# Altium PCB 24V-70A-Power-Board-v2.0.PcbDoc (part 1 of 9)
Units mm, origin at the board's own origin, x right, y up, seen from the top; angles counter-clockwise.
Board outline 350 x 215 mm, 2 copper layers (Top Layer, Bottom Layer), stack 1.64 mm thick; 337 components, 182 nets, 856 pads, 561 vias.
Unrouted connection lines stored in the file: 58.
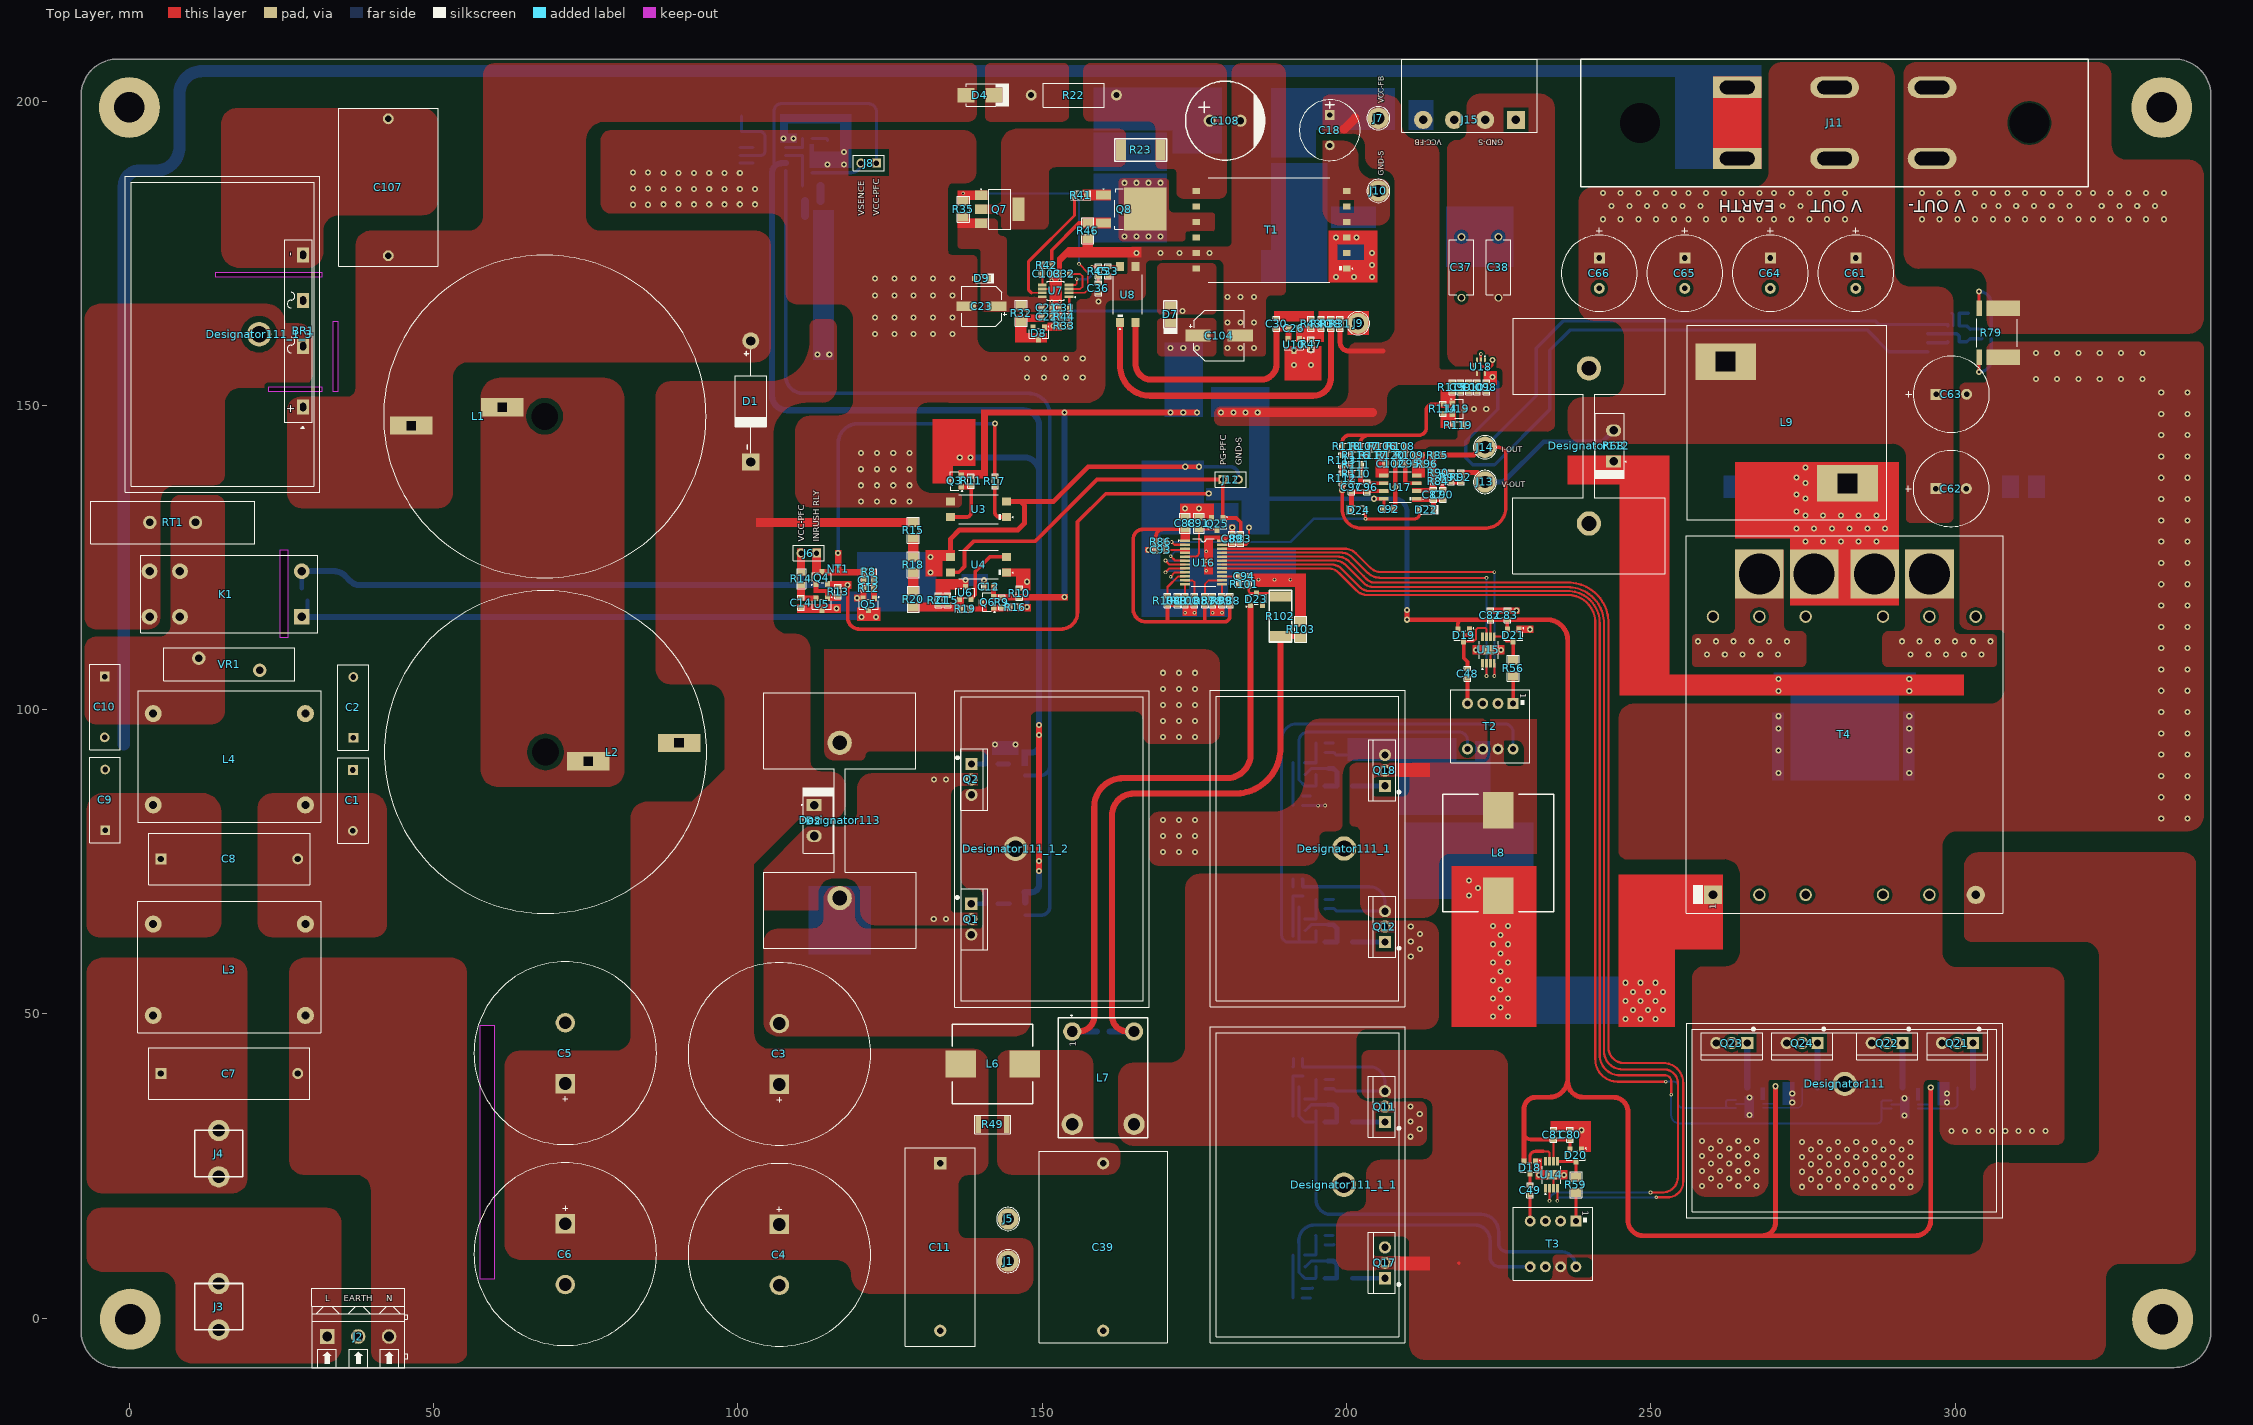
[diagram p0: Top Layer view]
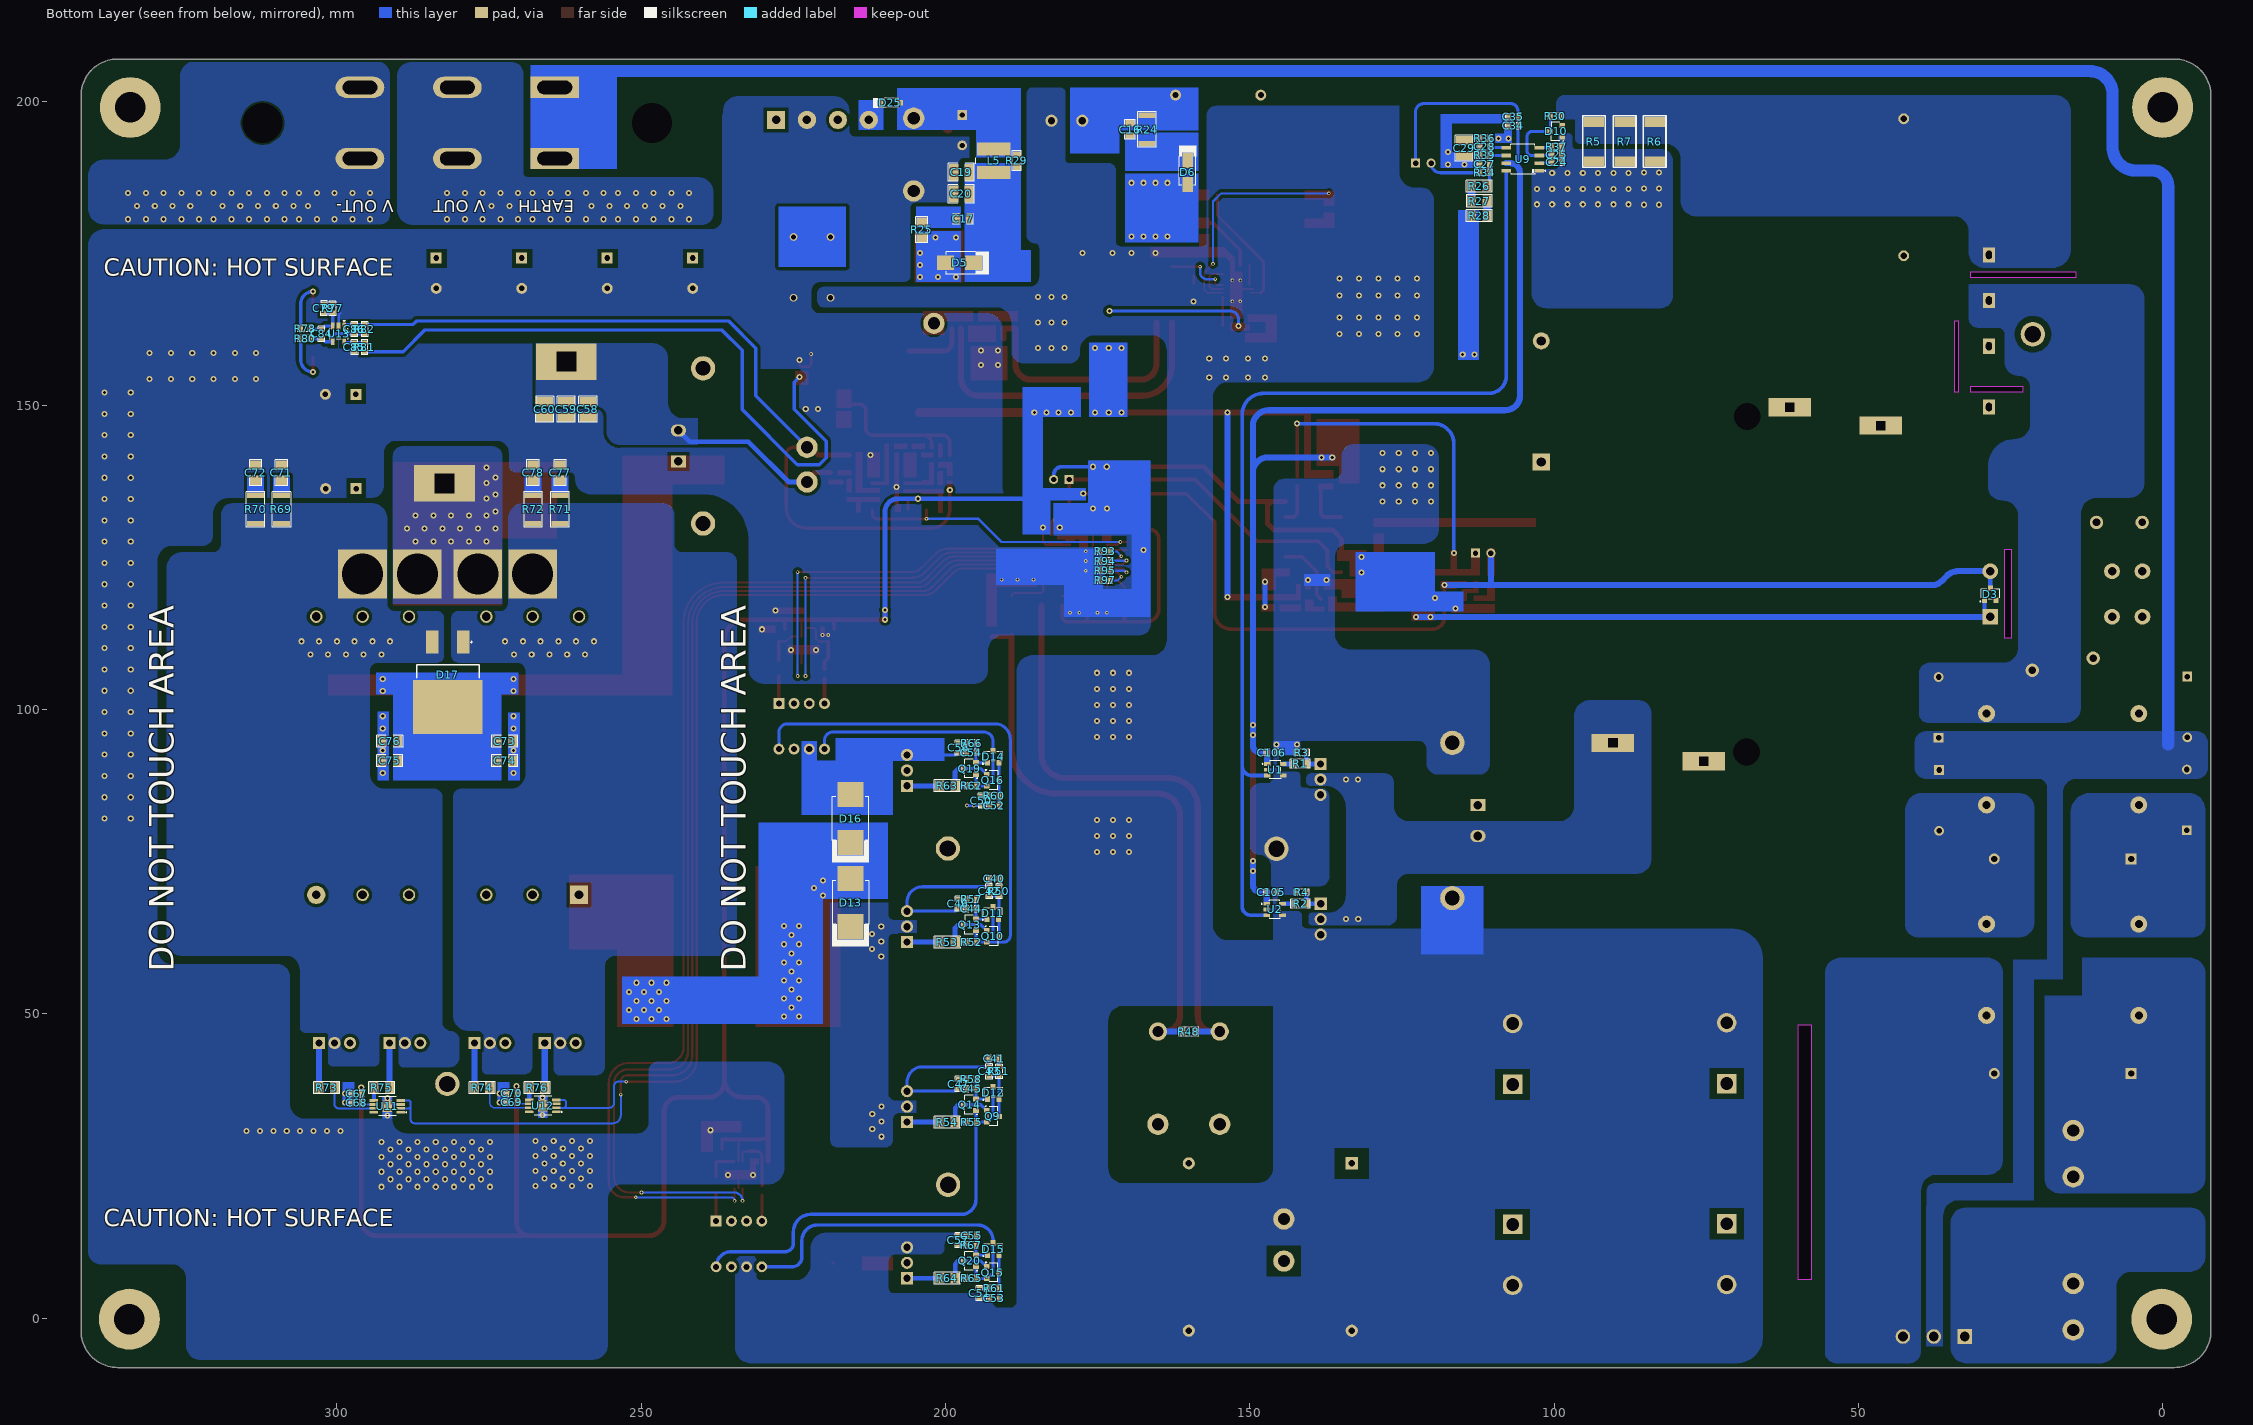
[diagram p1: Bottom Layer view, seen from below]

## Layer stack, top to bottom
Top Solder: solder mask 0.0102, Solder Resist, Dk 3.5
Top Layer: signal copper 0.07
Dielectric 1: core 1.5, FR-4, Dk 4.6
Bottom Layer: signal copper 0.07
Bottom Solder: solder mask 0.0102, Solder Resist, Dk 3.5

## Board outline
-7.942,-2.091 -7.942,200.909 cw(c-1.942,200.909) -1.942,206.909 336.058,206.909 cw(c336.058,200.909) 342.058,200.909 342.058,-2.091 cw(c336.058,-2.091) 336.058,-8.091 -1.942,-8.091 cw(c-1.942,-2.091)
cut-out: 34.282,152.281 33.482,152.281 33.482,163.853 34.282,163.853
cut-out: 24.765,111.785 24.765,126.263 26.035,126.263 26.035,111.785
cut-out: 57.658,6.452 57.658,48.113 59.99,48.113 59.99,6.452
cut-out: 22.936,152.281 22.936,153.081 31.648,153.081 31.648,152.281
cut-out: 14.199,171.094 14.199,171.894 31.648,171.894 31.648,171.094

## Design rules (kind name [scope] priority, off if disabled: settings)
BoardOutlineClearance [All] p1: gap=0 ignorepadtopadclearanceinfootprint=FALSE except(0.508: Poly-OutlineEdge)
Clearance [All] p1: gap=0.254 ignorepadtopadclearanceinfootprint=FALSE except(0.178: SMDPad-SMDPad; 0.508: Arc-Poly Track-Poly SMDPad-Poly THPad-Poly Via-Poly Fill-Poly Poly-Poly; 0.762: Poly-Region)
ComponentClearance [All] p1: gap=0 collisioncheckmode=3 verticalgap=0 showdistances=FALSE
Height [All] p1: minheight=0 maxheight=100 prefheight=12.7
HoleSize [All] p1: absolutevalues=TRUE maxlimit=25.4 minlimit=0.025 maxpercent=80.000 minpercent=20.000
MinimumSolderMaskSliver [All] p1: minsoldermaskwidth=0
PolygonConnect [All] p1: connectstyle=Direct reliefconductorwidth=0.254 reliefentries=4 polygonreliefangle="90 Angle" airgapwidth=0.254
RoutingVias [All] p1: holewidth=0.5 width=1 viastyle="Through Hole" minholewidth=0.3 minwidth=0.6 maxholewidth=0.5 maxwidth=1
SilkToSolderMaskClearance [IsPad] p1: minsilkscreentomaskgap=0 clearancetoexposedcopper=TRUE
SolderMaskExpansion Via [isvia] p1: expansion=0.102 istentingtop=TRUE
SupplyNets "Schematic Supply Nets_5" [InNet('GND-S')] p1: voltage=0.000
SupplyNets "Schematic Supply Nets_4" [InNet('GND')] p2: voltage=0.000
SupplyNets "Schematic Supply Nets_2" [InNet('AC_N')] p3: voltage=0.000
SupplyNets "Schematic Supply Nets_1" [InNet('EARTH')] p4: voltage=0.000
SupplyNets "Schematic Supply Nets" [InNet('AC_L')] p5: voltage=0.000
Width [All] p1: maxlimit=2.54 minlimit=0.127 preferedwidth=0.254 minimp=50.000000 maximp=50.000000 favimp=50.000000
25 further rules are at their usual default settings.

## Classes and differential pairs
component class U_Power_Sheet: C37 C38 C39 C40 C41 C42 C43 C44 C45 C46 C47 C48 C49 C50 C51 C52 C53 C54 C55 C56 C57 C58 C59 C60 C61 C62 C63 C64 C65 C66 C67 C68 C69 C70 C73 C74 C75 C76 C77 C78 C79 C80 C81 C82 C83 C84 C85 C86 D11 D12 D13 D14 D15 D16 D17 D18 D19 D20 D21 J11 L6 L7 L8 L9 Q9 Q10 Q11 Q12 Q13 Q14 Q15 Q16 Q17 Q18 Q19 Q20 Q21 Q22 Q23 Q24 R48 R49 R50 R51 R52 R53 R54 R55 R56 R57 R58 R59 R60 R61 R62 R63 R64 R65 R66 R67 R68 R71 R72 R73 R74 R75 R76 R77 R78 R79 R80 R81 R82 T2 T3 T4 U11 U12 U13 U14 U15
component class U_Control_Sheet: C87 C88 C89 C90 C91 C92 C93 C94 C95 C96 C97 C98 C99 C100 C101 C102 D22 D23 D24 D25 J12 J13 J14 J15 Q25 R83 R84 R85 R86 R87 R88 R89 R90 R91 R92 R93 R94 R95 R96 R97 R98 R99 R100 R101 R102 R103 R104 R105 R106 R107 R108 R109 R110 R111 R112 R113 R114 R115 R116 R117 R118 R119 R120 U16 U17 U18 U19
component class U_PFC_Sheet: BR1 C1 C2 C3 C4 C5 C6 C7 C8 C9 C10 C11 C12 C13 C14 C15 C16 C17 C18 C19 C20 C21 C22 C23 C24 C25 C26 C27 C28 C29 C30 C31 C32 C33 C34 C35 C36 C103 C104 C105 C106 C107 C108 D1 D2 D3 D4 D5 D6 D7 D8 D9 D10 J1 J2 J3 J4 J5 J6 J7 J8 J9 J10 K1 L1 L2 L3 L4 L5 NT1 Q1 Q2 Q3 Q4 Q5 Q6 Q7 Q8 R1 R2 R3 R4 R5 R6 R7 R8 R9 R10 R11 R12 R13 R14 R15 R16 R17 R18 R19 R20 R21 R22 R23 R24 R25 R26 R27 R28 R29 R30 R31 R32 R33 R34 R35 R36 R37 R38 R39 R40 R41 R42 R43 R44 R45 R46 R47 RT1 T1 U1 U2 U3 U4 U5 U6 U7 U8 U9 U10 VR1

## Components (designator, comment, footprint, x,y, rotation, side; value= is the part's Value field where it differs from the comment)
BR1 "GSIB2560-E3/45" GSIB-5S 28.538,162.235 r90 top
C1 "4.7nF" C771U472MYWDBA7317 36.739,85.096 r270 top
C2 "4.7nF" C771U472MYWDBA7317 36.816,100.374 r90 top
C3 "330uF" 381LR331M450K052 106.807,43.434 r90 top
C4 "330uF" 381LR331M450K052 106.807,10.414 r270 top
C5 "330uF" 381LR331M450K052 71.628,43.561 r90 top
C6 "330uF" 381LR331M450K052 71.628,10.541 r270 top
C7 "0.47uF" B32933A3474M000 16.412,40.219 r0 top value=470nF
C8 "0.47uF" B32933A3474M000 16.412,75.478 r0 top value=470nF
C9 "4.7nF" C771U472MYWDBA7317 -3.983,85.172 r90 top
C10 "4.7nF" C771U472MYWDBA7317 -4.06,100.45 r270 top
C11 "1uF" R75PR4100AA30K 133.245,11.708 r270 top value=470nF
C12 "1uF" Cap-0603 141.255,120.211 r0 top
C13 "0.1uF" Cap-0603 121.505,121.298 r0 top value=100nF
C14 "4.7uF" Cap-0603 110.373,117.566 r90 top
C15 "2700pF" Cap-0603 134.473,118.017 r270 top value=2.7nF
C16 "1nF" Cap-0805 169.672,195.342 r90 bottom
C17 "1nF" Cap-0805 197.104,180.642 r0 bottom
C18 "1000uF" EEU-FM1C102B 197.256,197.731 r270 top value=1mF
C19 "10uF" Cap-1210 197.383,188.305 r180 bottom
C20 "10uF" Cap-1210 197.383,184.749 r180 bottom
C21 "0.1uF" Cap-0603 150.786,166.048 r180 top value=100nF
C22 "1uF" Cap-0603 150.787,164.615 r180 top
C23 "22uF" EEEFK1H220P 140.046,166.289 r180 top
C24 "2700pF" Cap-0603 99.549,189.941 r0 bottom value=2.7nF
C25 "560pF" Cap-0603 99.549,191.211 r0 bottom
C26 "560pF" Cap-0603 191.364,162.658 r0 top
C27 "820pF" Cap-0603 111.404,189.644 r180 bottom
C28 "0.47uF" Cap-0603 111.379,192.485 r180 bottom
C29 "3.3uF" Cap-1210 114.751,192.278 r90 bottom
C30 "0.1uF" Cap-0603 188.519,163.42 r270 top value=100nF
C31 "68pF" Cap-0603 153.661,166.048 r0 top
C32 "0.22uF" Cap-0603 153.661,171.603 r0 top
C33 "220pF" Cap-0603 160.807,172.041 r90 top
C34 "1uF" Cap-0603 106.716,195.936 r180 bottom
C35 "0.1uF" Cap-0603 106.716,197.434 r180 bottom value=100nF
C36 "22nF" Cap-0603 159.233,169.267 r90 top
C37 "2.2nF" DE1E3RA222MN4AP01F 218.897,167.691 r90 top
C38 "2.2nF" DE1E3RA222MN4AP01F 224.968,177.691 r270 top
C39 "10uF" B32774X5106K000 160.02,11.708 r90 top
C40 "0.1uF" Cap-0603 191.973,72.212 r0 bottom value=100nF
C41 "0.1uF" Cap-0603 192.024,42.672 r0 bottom value=100nF
C42 "22nF" Cap-0603 192.817,70.145 r90 bottom
C43 "22nF" Cap-0603 192.817,40.562 r90 bottom
C44 "22nF" Cap-0603 195.745,67.288 r0 bottom
C45 "22nF" Cap-0603 195.744,37.705 r0 bottom
C46 "0.1uF" Cap-0603 197.904,68.088 r270 bottom value=100nF
C47 "0.1uF" Cap-0603 197.865,38.489 r270 bottom value=100nF
C48 "1uF" Cap-0603 219.892,105.918 r270 top
C49 "1uF" Cap-0603 230.189,21.031 r270 top
C50 "0.1uF" Cap-0603 194.107,85.014 r270 bottom value=100nF
C51 "0.1uF" Cap-0603 194.409,4.125 r270 bottom value=100nF
C52 "22nF" Cap-0603 191.98,84.245 r0 bottom
C53 "22nF" Cap-0603 191.98,3.325 r0 bottom
C54 "22nF" Cap-0603 195.745,92.957 r0 bottom
C55 "22nF" Cap-0603 195.719,13.598 r0 bottom
C56 "0.1uF" Cap-0603 197.831,93.754 r270 bottom value=100nF
C57 "0.1uF" Cap-0603 197.904,12.836 r90 bottom value=100nF
C58 "10uF" Cap-1210 258.764,149.352 r90 bottom
C59 "10uF" Cap-1210 262.32,149.352 r90 bottom
C60 "10uF" Cap-1210 265.876,149.352 r90 bottom
C61 "470uF" EKZM500ELL471MK20S 283.696,171.732 r270 top
C62 "470uF" EKZM500ELL471MK20S 299.357,136.339 r0 top
C63 "470uF" EKZM500ELL471MK20S 299.397,151.833 r0 top
C64 "470uF" EKZM500ELL471MK20S 269.646,171.732 r270 top
C65 "470uF" EKZM500ELL471MK20S 255.595,171.732 r270 top
C66 "470uF" EKZM500ELL471MK20S 241.545,171.732 r270 top
C67 "0.1uF" Cap-0603 296.776,36.863 r180 bottom value=100nF
C68 "1uF" Cap-0603 296.776,35.39 r180 bottom
C69 "1uF" Cap-0603 271.249,35.483 r180 bottom
C70 "0.1uF" Cap-0603 271.249,36.956 r180 bottom value=100nF
C71 "470pF" Cap-1206 309.118,138.961 r270 bottom
C72 "470pF" Cap-1206 313.373,138.961 r270 bottom
C73 "100nF" Cap-1206 272.418,94.844 r0 bottom
C74 "100nF" Cap-1206 272.418,91.626 r0 bottom
C75 "100nF" Cap-1206 291.341,91.626 r180 bottom
C76 "100nF" Cap-1206 291.341,94.844 r180 bottom
C77 "470pF" Cap-1206 263.34,138.961 r270 bottom
C78 "470pF" Cap-1206 267.785,138.961 r270 bottom
C79 "22nF" Cap-0603 302.17,165.944 r270 bottom
C80 "0.1uF" Cap-0603 236.739,30.14 r270 top value=100nF
C81 "1uF" Cap-0603 234.011,30.14 r270 top
C82 "0.1uF" Cap-0603 223.653,115.551 r270 top value=100nF
C83 "1uF" Cap-0603 226.442,115.551 r270 top
C84 "1000pF" Cap-0603 302.536,161.752 r90 bottom
C85 "0.1uF" Cap-0603 297.148,159.563 r270 bottom value=100nF
C86 "22nF" Cap-0603 297.148,162.544 r270 bottom
C87 "2.2nF" Cap-0603 214.287,135.306 r90 top
C88 "2.2uF" Cap-0805 173.491,130.655 r270 top
C89 "1uF" Cap-0603 181.229,128.092 r270 top
C90 "0.1uF" Cap-0603 215.824,135.306 r270 top value=100nF
C91 "0.47uF" Cap-0805 175.752,130.654 r270 top
C92 "1uF" Cap-0603 206.914,132.944 r180 top
C93 "220pF" Cap-0603 169.452,126.263 r0 top
C94 "330pF" Cap-0603 183.181,121.913 r180 top
C95 "0.22uF" Cap-0603 210.407,140.406 r180 top
C96 "560pF" Cap-0603 203.391,136.576 r90 top
C97 "22nF" Cap-0603 200.838,136.576 r90 top
C98 "1uF" Cap-0603 222.974,153.01 r90 top
C99 "1uF" Cap-0603 218.751,153.01 r90 top
C100 "1uF" Cap-0603 220.116,153.01 r90 top
C101 "330pF" Cap-0603 221.481,153.01 r90 top
C102 "0.22uF" Cap-0603 207.277,140.406 r180 top
C103 "220pF" Cap-0603 150.786,171.602 r180 top
C104 "100uF" 25SVPF100M. 179.084,161.493 r0 top
C105 "1uF" Cap-0603 146.455,70.006 r0 bottom
C106 "1uF" Cap-0603 146.353,92.967 r0 bottom
C107 "2.2uF" ECW-FA2J225J 42.545,185.852 r270 top
C108 "22uF" 01EC2051 180.061,196.794 r0 top
D1 "1N5406-E3/73" DO-201AD 102.108,150.666 r90 top
D2 "IDH10SG60C" TO-220-2 112.522,81.788 r270 top
D3 "BAS21HE3-TP" SOT-23 28.325,118.967 r180 bottom
D4 "RS1MB-13-F" SMB_ 139.753,200.99 r0 top value=15pF
D5 "MBRS2H100T3G" SMB_ 197.688,173.431 r180 bottom
D6 "MURA160T3G" SMA 160.207,188.284 r270 bottom
D7 "SMD110PL-TP" SOD-123FL 171.069,164.981 r90 top
D8 "BAS21HE3-TP" SOT-23 149.418,161.835 r180 top
D9 "MMSZ5243BS-7-F" SOD-323 140.046,170.861 r180 top
D10 "BAS21HE3-TP" SOT-23 99.676,195.021 r90 bottom
D11 "BAT54SLT1G" SOT-23 192.209,66.583 r180 bottom value=7.6pF
D12 "BAT54SLT1G" SOT-23 192.159,37.037 r180 bottom value=7.6pF
D13 "MURS360T3G" SMC 215.595,68.309 r90 bottom
D14 "BAT54SLT1G" SOT-23 192.173,92.288 r180 bottom value=7.6pF
D15 "BAT54SLT1G" SOT-23 192.159,11.368 r180 bottom value=7.6pF
D16 "MURS360T3G" SMC 215.595,82.106 r90 bottom
D17 "MURB1620CTT4G" D2Pak. 281.816,105.776 r0 bottom
D18 "BAT54SLT1G" SOT-23 230.126,24.768 r180 top value=7.6pF
D19 "BAT54SLT1G" SOT-23 219.264,112.216 r180 top value=7.6pF
D20 "BAT54SLT1G" SOT-23 237.689,26.768 r180 top value=7.6pF
D21 "BAT54SLT1G" SOT-23 227.392,112.216 r180 top value=7.6pF
D22 "BAT42WS-7-F" SOD-323 213.137,132.829 r180 top
D23 "BAS21HE3-TP" SOT-23 185.213,118.159 r0 top
D24 "BAT42WS-7-F" SOD-323 201.988,132.816 r0 top
D25 "1N5819HW-7-F" SOD-123 209.069,199.717 r0 bottom
Designator111 "Comment" "SK 481 50 SA" 281.859,38.5 r0 top locked
Designator111_1 "Comment" "SK 481 50 SA" 199.6,77.194 r270 top locked
Designator111_1_1 "Comment" "SK 481 50 SA" 199.586,21.942 r270 top locked
Designator111_1_2 "Comment" "SK 481 50 SA" 145.618,77.143 r90 top
Designator111_1_3 "Comment" "SK 481 50 SA" 21.314,161.699 r270 top
Designator112 "Comment" XSD366-094 239.847,143.35 r90 top
Designator113 "Comment" XSD366-094 116.715,81.807 r270 top
J1 "5010" 5010 144.399,9.398 r0 top
J2 "DB128L-5.08-3P-OG-S" DB128L-5.08-3P-OG-S 37.592,-2.997 r0 top
J3 "01020071Z" 01020071Z 14.691,1.905 r270 top
J4 "01020071Z" 01020071Z 14.691,27.051 r270 top
J5 "5011" 5011 144.399,16.317 r0 top
J6 "X6511WV-02H-C60D30" HDR1X2_ 112.913,125.73 r180 top
J7 "5010" 5010 205.232,197.201 r0 top
J8 "X6511WV-02H-C60D30" HDR1X2_ 122.761,189.814 r180 top
J9 "5012" 5012 201.905,163.496 r0 top
J10 "5011" 5011 205.232,185.243 r0 top
J11 "KF88SM-16.0-3P" KF88SM-16.0-3P 280.22,196.418 r0 top
J12 "X6511WV-02H-C60D30" HDR1X2_ 179.688,137.83 r0 top
J13 "5010" 5010 222.758,137.421 r90 top
J14 "5010" 5010 222.758,143.129 r180 top
J15 "1757268" 1757268 220.229,196.923 r180 top
K1 "ALZ51B12W" ALZ51B12W 15.812,119.014 r180 top
L1 "118uH" 760801401 46.315,146.687 r180 top
L2 "118uH" 760801401 90.327,94.545 r0 top
L3 "7448251201" 7448251201 16.419,57.266 r0 top
L4 "7448251201" 7448251201 16.419,91.861 r0 top
L5 "2.2uH" 7447745022 192.1,190.23 r90 bottom
L6 "7443550230" 7443550230 141.859,41.783 r0 top
L7 "CS4100V-01L" CS4100V-01L 160.02,39.497 r90 top value=20mH
L8 "10uH" CSBL1809-100M 224.942,76.464 r270 top
L9 "8.2uH" CPRX3231L-8R2MC 272.32,147.204 r90 top
NT1 "Net Tie_SMD" "Net Tie Pad" 116.478,123.136 r270 top net-tie
Q1 "IPP65R125C7" TO-220-3 138.349,65.586 r270 top
Q2 "IPP65R125C7" TO-220-3 138.374,88.548 r270 top
Q3 "SI2319DS-T1-E3" SOT-23 135.667,137.587 r90 top
Q4 "SI2309CDS-T1-E3" SOT-23 113.792,121.666 r0 top
Q5 "BSS138" Sot-23 121.495,117.328 r180 top
Q6 "MMBT3906" SOT-23 141.017,117.696 r90 top
Q7 "BSP135H6327XTSA1" "SOT- 223" 143.031,182.232 r270 top
Q8 "FCD4N60TM-VB" TO-252-2L 163.509,182.276 r270 top
Q9 "MMBT3904" SOT-23 192.218,33.187 r270 bottom
Q10 "MMBT3904" SOT-23 192.218,62.769 r270 bottom
Q11 "IPP65R190CFDXKSA1" TO-220-3 206.318,34.777 r90 top
Q12 "IPP65R190CFDXKSA1" TO-220-3 206.331,64.359 r90 top
Q13 "MMBT3906-7-F" SOT-23 195.996,64.669 r90 bottom
Q14 "MMBT3906-7-F" SOT-23 195.996,35.087 r90 bottom
Q15 "MMBT3904" SOT-23 192.218,7.518 r270 bottom
Q16 "MMBT3904" SOT-23 192.218,88.438 r270 bottom
Q17 "IPP65R190CFDXKSA1" TO-220-3 206.318,9.108 r90 top
Q18 "IPP65R190CFDXKSA1" TO-220-3 206.331,90.028 r90 top
Q19 "MMBT3906-7-F" SOT-23 195.996,90.338 r90 bottom
Q20 "MMBT3906-7-F" SOT-23 195.996,9.418 r90 bottom
Q21 "IPP120N20NFD" TO-220-3 300.401,45.231 r180 top
Q22 "IPP120N20NFD" TO-220-3 288.844,45.231 r180 top
Q23 "IPP120N20NFD" TO-220-3 263.317,45.231 r180 top
Q24 "IPP120N20NFD" TO-220-3 274.874,45.231 r180 top
Q25 "BSS138" Sot-23 178.738,130.527 r180 top
R1 "2.21R" RES-0805 141.727,91.088 r180 bottom
R2 "2.21R" RES-0805 141.653,68.126 r180 bottom
R3 "10K" Res-0603 141.488,92.967 r180 bottom value=10kR
R4 "10K" Res-0603 141.463,70.006 r180 bottom value=10kR
R5 "30mR" RES-2512 93.461,193.346 r270 bottom
R6 "30mR" RES-2512 83.464,193.346 r270 bottom
R7 "30mR" RES-2512 88.392,193.346 r270 bottom
R8 "10K" Res-0603 121.505,122.666 r180 top value=10kR
R9 "47.5K" Res-0603 143.385,117.633 r90 top value=47.5kR
R10 "8.25K" Res-0603 146.225,119.169 r270 top
R11 "47.5K" Res-0603 138.318,137.587 r90 top
R12 "100K" Res-0603 121.505,119.93 r0 top value=100kR
R13 "10K" Res-0603 116.478,119.421 r90 top value=10kR
R14 "1M" RES-0805 110.373,121.523 r90 top value=1MR
R15 "715K" Res-1206 128.803,129.489 r90 top
R16 "100K" Res-0603 145.539,116.871 r180 top value=100kR
R17 "10K" Res-0603 142.227,137.524 r90 top value=10kR
R18 "715K" Res-1206 128.803,123.821 r90 top
R19 "909K" Res-0603 137.366,116.578 r0 top
R20 "698K" Res-1206 128.803,118.153 r90 top
R21 "6.18K" Res-0603 132.944,118.008 r270 top
R22 "22R Fusible" EMC2-22RKI 155.194,200.99 r180 top value=22R
R23 "10K" RES-2512 166.197,191.999 r0 top value=10kR
R24 "150K" RES-2010 166.878,195.342 r90 bottom
R25 "100R" Res-1206 203.886,178.872 r90 bottom
R26 "332K" Res-1206 112.293,186.049 r0 bottom
R27 "332K" Res-1206 112.293,183.591 r180 bottom
R28 "332K" Res-1206 112.293,181.153 r0 bottom
R29 "2.21R" RES-0805 188.265,190.231 r90 bottom
R30 "221R" Res-0603 99.822,197.561 r0 bottom
R31 "49.9R" Res-0603 198.958,163.42 r270 top
R32 "100R" Res-1206 146.558,165.123 r270 top
R33 "23.2K" Res-0603 153.661,163.119 r180 top value=23.2kR
R34 "100K" Res-0603 111.379,188.244 r0 bottom value=100kR
R35 "10M" Res-1206 137.006,182.276 r270 top
R36 "33.2K" Res-0603 111.379,193.878 r180 bottom
R37 "16.2K" Res-0603 99.549,192.481 r180 bottom
R38 "10K" Res-0603 197.434,163.42 r90 top value=10kR
R39 "13K" Res-0603 111.379,191.084 r180 bottom
R40 "86.6k" Res-0603 195.856,163.42 r90 top value=86.6kR
R41 "2.21R" RES-0805 156.337,184.576 r0 top
R42 "7.5K" Res-0603 150.787,173.038 r0 top value=7.5kR
R43 "7.5K" Res-0603 194.183,163.42 r270 top
R44 "6.34k" Res-0603 153.661,164.615 r0 top
R45 "16.2K" Res-0603 159.233,172.041 r90 top
R46 "1R" Res-1206 157.48,178.706 r90 top
R47 "10K" Res-0603 194.183,160.067 r90 top value=10kR
R48 "100K" RES-0805 160.02,47.117 r180 bottom
R49 "10R" RES-2010 141.859,31.877 r0 top
R50 "100R" Res-0603 191.218,70.145 r90 bottom
R51 "100R" Res-0603 191.218,40.562 r90 bottom
R52 "100R" Res-0603 195.719,61.819 r0 bottom
R53 "10R" Res-1206 199.695,61.819 r0 bottom
R54 "10R" Res-1206 199.695,32.237 r0 bottom
R55 "100R" Res-0603 195.719,32.237 r0 bottom
R56 "2.21R" Res-1206 227.392,106.807 r270 top
R57 "100R" Res-0603 195.719,68.85 r0 bottom
R58 "100R" Res-0603 195.744,39.265 r0 bottom
R59 "2.21R" Res-1206 237.689,21.92 r270 top
R60 "100R" Res-0603 191.98,85.845 r0 bottom
R61 "100R" Res-0603 191.98,4.924 r0 bottom
R62 "100R" Res-0603 195.719,87.488 r0 bottom
R63 "10R" Res-1206 199.695,87.488 r0 bottom
R64 "10R" Res-1206 199.695,6.568 r0 bottom
R65 "100R" Res-0603 195.719,6.568 r0 bottom
R66 "100R" Res-0603 195.719,94.519 r0 bottom
R67 "100R" Res-0603 195.744,12.036 r0 bottom
R68 "1K" TO-220-2 243.897,143.35 r90 top
R69 "10R" RES-2010 309.118,132.929 r270 bottom
R70 "10R" RES-2010 313.373,132.929 r270 bottom
R71 "10R" RES-2010 263.34,132.929 r270 bottom
R72 "10R" RES-2010 267.785,132.929 r270 bottom
R73 "2.21R" Res-1206 301.671,37.916 r0 bottom
R74 "2.21R" Res-1206 276.144,37.916 r180 bottom
R75 "2.21R" Res-1206 292.654,37.916 r180 bottom
R76 "2.21R" Res-1206 267.127,37.916 r180 bottom
R77 "165K" Res-0603 300.707,165.944 r90 bottom value=165kR
R78 "1K" Res-0603 305.203,162.616 r180 bottom value=1kR
R79 "0.2mR" BVR-Z-R0002-1.0 305.949,161.935 r270 top
R80 "1K" Res-0603 305.203,160.99 r180 bottom value=1kR
R81 "100R" Res-0603 295.504,159.563 r90 bottom
R82 "165K" Res-0603 295.504,162.544 r90 bottom value=165kR
R83 "100K" Res-0603 182.61,128.092 r270 top value=100kR
R84 "68.1K" Res-0603 215.049,137.511 r180 top
R85 "100K" Res-0603 215.036,141.854 r0 top value=100kR
R86 "10K" Res-0603 169.452,127.563 r0 top value=10kR
R87 "8.25K" Res-0603 176.733,117.94 r270 top
R88 "8.25K" Res-0603 180.848,117.94 r270 top
R89 "15.4K" Res-0603 172.212,117.94 r270 top
R90 "33.2K" Res-0603 215.049,138.959 r0 top
R91 "2.49K" Res-0603 217.17,138.196 r270 top value=2.49kR
R92 "49.9R" Res-0603 218.811,138.196 r90 top
R93 "49K9" Res-0603 173.755,126.013 r180 bottom
R94 "49K9" Res-0603 173.755,124.429 r180 bottom
R95 "49K9" Res-0603 173.778,122.846 r180 bottom
R96 "2.37K" Res-0603 213.29,140.406 r0 top
R97 "13K" Res-0603 173.778,121.263 r180 bottom value=13kR
R98 "4.64K" Res-0603 178.003,117.94 r90 top value=4.64kR
R99 "348R" Res-0603 179.536,117.94 r90 top
R100 "562R" Res-0603 173.491,117.935 r90 top
R101 "1K" Res-0603 183.181,120.613 r0 top value=1kR
R102 "16.2R" RES-2512 189.154,115.366 r270 top
R103 "0R" Res-1206 192.456,113.199 r90 top value=0mR
R104 "60.4K" Res-0603 170.582,117.935 r90 top
R105 "90.9K" Res-0603 175.023,117.937 r90 top
R106 "100K" Res-0603 205.939,143.281 r180 top value=100kR
R107 "100K" Res-0603 203.007,143.281 r180 top value=100kR
R108 "140K" Res-0603 208.883,143.282 r180 top
R109 "102K" Res-0603 210.407,141.854 r180 top value=102kR
R110 "150K" Res-0603 201.6,138.811 r0 top value=150kR
R111 "28K" Res-0603 201.6,140.259 r180 top
R112 "49.9R" Res-0603 199.314,138.049 r270 top
R113 "27.4K" Res-0603 199.301,141.021 r90 top
R114 "10K" Res-0603 215.871,149.443 r90 top value=10kR
R115 "1K" Res-0603 217.386,153.01 r90 top value=1kR
R116 "100K" Res-0603 201.6,141.854 r180 top value=100kR
R117 "47.5K" Res-0603 204.394,141.854 r180 top value=47.5kR
R118 "4.75K" Res-0603 200.076,143.281 r180 top
R119 "10K" Res-0603 218.386,146.776 r0 top value=10kR
R120 "102K" Res-0603 207.277,141.854 r180 top value=102kR
RT1 "B57464S0100M000" B57464S0100M000 7.112,130.777 r180 top
T1 "7508111323" 7508111323 187.702,178.872 r180 top
T2 "56PR3362" 56PR3362 223.642,97.273 r270 top
T3 "56PR3362" 56PR3362 233.939,12.208 r270 top
T4 "PQ50-50 145400-A" "PQ50-50 145400-A" 260.226,69.581 r90 top
U1 "UCC27517DBVR" SOT-23-5 145.815,90.138 r180 bottom
U2 "UCC27517DBVR" SOT-23-5 145.917,67.176 r180 bottom
U3 "FOD817DSD" FOD817DSD 139.553,132.936 r180 top
U4 "FOD817DSD" FOD817DSD 139.553,123.843 r180 top
U5 "TL431AIDBZR" SOT-23 113.792,117.328 r180 top
U6 "LMV431AIMFX/NOPB" SOT-23 137.366,119.185 r0 top
U7 "LM5023MM-2/NOPB" VSSOP-8-0.65mm 152.223,168.829 r180 top
U8 "FOD817DSD" FOD817DSD 164.064,168.203 r90 top
U9 "UCC28180DR" SOIC-8 105.156,190.449 r0 bottom
U10 "LMV431AIMFX/NOPB" SOT-23 191.364,159.94 r180 top
U11 "UCC27524DGN" 8-HVSSOP 291.724,34.816 r0 bottom
U12 "UCC27524DGN" 8-HVSSOP 266.197,34.909 r0 bottom
U13 "OPA378AIDBVR" SOT-23-5 299.742,161.752 r270 bottom
U14 "UCC27524DGN" 8-HVSSOP 233.686,23.568 r90 top
U15 "UCC27524DGN" 8-HVSSOP 223.328,109.819 r90 top
U16 "UCC28951PWR" TSSOP-24 176.514,124.188 r0 top
U17 "TLC272CDR" "SOIC-8(0.154\", 3.90mm Width)" 208.839,136.576 r180 top
U18 "TPS715345DCKR" SC70-5 222.085,156.363 r270 top
U19 "TL431AIDBZR" SOT-23 218.386,149.443 r270 top
VR1 "B72220S2271K101" B72220S2271K101 16.415,107.472 r0 top value=630pF

## Footprints (in the part's own frame and the unit in brackets; to place one, negate y for a bottom-side part, rotate by r counter-clockwise, add the part's x,y. Pads: shape width x height; smd on the part's side, far side on the other; paste and mask are expansions set on the pad)
01EC2051 [mm]
  round 2 hole 1.2: 1(-2.54,0) 2(2.54,0)
  silkscreen extent -6.5,-6.5 6.5,6.5, body extent -6.25,-6.24 6.25,6.25, height 20.01
8-HVSSOP [mm]
  rect 1.4x0.45 smd mask+0.05: 1(-2.2,0.975) 2(-2.2,0.325) 3(-2.2,-0.325) 4(-2.2,-0.975) 5(2.2,-0.975) 6(2.2,-0.325) 7(2.2,0.325) 8(2.2,0.975)
  rect 1.57x1.89 smd mask+0.05: 9(0,0)
  silkscreen extent -3.15,-1.55 1.4,1.55, body extent -2.45,-1.5 2.45,1.5, height 1.1
25SVPF100M. [mm]
  rect 4.15x1.9 smd: 1(-3.475,0) 2(3.475,0)
  silkscreen extent -4.9,-4.15 4.15,4.15, body extent -4.5,-4.15 4.5,4.15, height 6.9
56PR3362 [mm]
  rect 1.8x1.8 hole 1: 1(-3.75,3.75)
  round 1.8 hole 1: 2(-3.75,1.25) 3(-3.75,-1.25) 4(-3.75,-3.75) 5(3.75,-3.75) 6(3.75,-1.25) 7(3.75,1.25) 8(3.75,3.75)
  silkscreen extent -6,-6.5 6,6.5, body extent -6.01,-6.51 5.99,6.49, height 12
381LR331M450K052 [mm]
  rect 3.2x3.2 hole 2.1: 1(-5,0)
  round 3.2 hole 2.1: 2(5,0)
  silkscreen extent -15,-15 15,15, body extent -15,-15 15,15, height 51
5010 [mm]
  round 3.5 hole 2: 1(0,0)
  silkscreen extent -1.91,-1.9 1.91,1.9, body extent -1.59,-1.58 1.59,1.58, height 8.12
5011 [mm]
  round 3.5 hole 2: 1(0,0)
  silkscreen extent -1.91,-1.9 1.91,1.9, body extent -1.59,-1.58 1.59,1.58, height 8.12
5012 [mm]
  round 3.5 hole 2: 1(0,0)
  silkscreen extent -1.91,-1.9 1.91,1.9, body extent -1.59,-1.58 1.59,1.58, height 8.12
01020071Z [mm]
  round 3.5 hole 2 paste-2539.97 mask+0.051: 1(-3.81,0) 1(3.81,0)
  silkscreen extent -3.81,-3.94 3.81,3.94, body extent -3.91,-3.93 3.91,3.93, height 10.78
1757268 [mm]
  rect 3x3 hole 1.4: 1(-7.62,0)
  round 3 hole 1.4: 2(-2.54,0) 3(2.54,0) 4(7.62,0)
  silkscreen extent -11.16,-10 11.16,2, body extent -11.16,-10 11.16,2, height 8.57
760801401 [mm]
  rect 7x3 hole 1.5 square: 1(0,0) 2(-14.95,-3)
  round 0 hole 4.4 unplated: M1(-21.95,-1.5)
  silkscreen extent -48.45,-28 4.55,25, body extent -46.09,-25.64 5.01,22.54, height 27.69
7443550230 [mm]
  rect 5x4.5 smd: 1(-5.25,0) 2(5.25,0)
  silkscreen extent -6.61,-6.53 6.61,6.53, body extent -6.51,-6.4 6.5,6.4, height 4.99
7447745022 [mm]
  rect 2.15x5.5 smd: 1(-1.925,0) 2(1.925,0)
  silkscreen extent -0.49,-2.93 0.49,2.93, body extent -2.6,-2.87 2.6,2.87, height 2
7448251201 [mm]
  round 2.8 hole 1.32: 1(-12.5,-7.5) 2(12.5,-7.5) 3(12.5,7.5) 4(-12.5,7.5)
  silkscreen extent -15.05,-10.31 15.04,11.23, body extent -15,-10.25 15,11.18, height 32.41
7508111323 [mm]
  rect 1.25x1 smd: 1(-12.36,6.35) 2(-12.36,3.81) 3(-12.36,1.27) 4(-12.36,-1.27) 5(-12.36,-3.81) 6(-12.36,-6.35) 7(12.36,-6.35) 8(12.36,-3.81) 9(12.36,-1.27) 10(12.36,1.27) 11(12.36,3.81) 12(12.36,6.35)
  silkscreen extent -13.3,-8.56 10.42,8.64, body extent -12.88,-8.47 12.88,8.56, height 13.49
ALZ51B12W [mm]
  rect 2.6x2.6 hole 1.4 mask+0.102: 1(-12.5,3.75)
  round 2.6 hole 1.4 mask+0.102: 2(7.5,3.75) 3(12.5,3.75) 4(12.5,-3.75) 5(7.5,-3.75) 6(-12.5,-3.75)
  silkscreen extent -15.15,-6.4 13.95,6.4, body extent -15.01,-6.25 13.8,6.25, height 15.7
B32774X5106K000 [mm]
  round 2 hole 1.05: 1(-13.75,0) 2(13.75,0)
  silkscreen extent -15.75,-10.5 15.75,10.5, body extent -15.75,-10.5 15.75,10.5, height 31
B32933A3474M000 [mm]
  rect 1.8x1.8 hole 1.05: 1(-11.25,0)
  round 1.8 hole 1.05: 2(11.25,0)
  silkscreen extent -13.25,-4.25 13.25,4.25, body extent -13.25,-4.25 13.25,4.26, height 16.51
B57464S0100M000 [mm]
  round 2.2 hole 1.25: 1(-3.75,0) 2(3.75,0)
  silkscreen extent -13.5,-3.5 13.5,3.5, body extent -13,-3.5 13,3.5, height 31
B72220S2271K101 [mm]
  round 2.2 hole 1.25: 1(-5,1) 2(5,-1)
  silkscreen extent -10.8,-2.74 10.79,2.74, body extent -10.75,-2.7 10.75,2.7, height 26
BVR-Z-R0002-1.0 [mm]
  rect 2.55x0.9 smd: 1(-4.025,-2) 3(4.025,-2)
  rect 2.55x5.5 smd: 2(-4.025,2) 4(4.025,2)
  silkscreen extent -2.29,-2.36 2.34,4.32, body extent -5.05,-2.33 5.05,4.27, height 3.4
C771U472MYWDBA7317 [mm]
  rect 1.6x1.6 hole 0.92: 1(-5,0)
  round 1.6 hole 0.92: 2(5,0)
  silkscreen extent -7,-2.46 7,2.54, body extent -7,-2.46 7,2.54, height 18.5
Cap-0603 [mil]
  rect 30x35 smd mask+2.36: 1(-30,0) 2(30,0)
  silkscreen extent -49,-21 49,21, body extent -32,-16 31,16, height 34
Cap-0805 [mil] "SMD 0805"
  rect 40x60 smd mask+2.76: 1(-40,0) 2(40,0)
  silkscreen extent -64,-34 64,34, body extent -39,-25 39,25, height 30
Cap-1206 [mil] "SMD 1206"
  rect 60x70 smd: 1(-50,0) 2(50,0)
  silkscreen extent -84,-39 84,39, body extent -63,-31 63,32, height 39
Cap-1210 [mil] "SMD 1210"
  rect 60x110 smd: 1(-50,0) 2(50,0)
  silkscreen extent -84,-59 84,59, body extent -63,-49 63,49, height 39
CPRX3231L-8R2MC [mm]
  rect 6x10 hole 3.2 square: 1(-10,-10) 2(10,10)
  silkscreen extent -16,-16.4 16,16.4, body extent -16,-16 16,16, height 29.98
CS4100V-01L [mm]
  round 3 hole 1.76: 1(7.62,5.08) 4(7.62,-5.08)
  round 3.5 hole 2.01: 2(-7.62,5.08) 3(-7.62,-5.08)
  silkscreen extent -9.86,-7.32 10.29,7.37, body extent -9.78,-7.24 9.78,7.24, height 19.05
CSBL1809-100M [mm]
  rect 6x5 smd mask+0.055: 1(-7,0) 2(7,0)
  silkscreen extent -9.65,-9.1 9.65,9.1, body extent -9.65,-9.1 9.65,9.1, height 9.16
D2Pak. [mm]
  rect 2.08x3.81 smd: 1(-2.54,-5.335) 2(2.54,-5.335)
  rect 11.43x8.89 smd: 3(0,5.335)
  silkscreen extent -5.21,-5.46 5.11,0.51, body extent -5.08,-6.6 5.02,8.79, height 4.5
DB128L-5.08-3P-OG-S [mm]
  rect 2.4x2.4 hole 1.6 paste-2539.97 mask+0.051: 1(-5.08,0)
  round 2.4 hole 1.6 paste-2539.97 mask+0.051: 2(0,0) 3(5.08,0)
  silkscreen extent -7.62,-5.1 8.12,5, body extent -7.62,-4.99 8.22,5.01, height 13.97
DE1E3RA222MN4AP01F [mm]
  round 1.28 hole 0.85: 1(0,0) 2(10,0)
  silkscreen extent 0.5,-2 9.5,2, body extent -0.33,-2 10.33,2, height 12
DO-201AD [mm]
  rect 2.8x2.8 hole 1.5: 1(-9.95,0)
  round 2.8 hole 1.5: 2(9.95,0)
  silkscreen extent -8.5,-2.52 8.5,2.53, body extent -10.58,-2.65 10.58,2.65, height 5.29
ECW-FA2J225J [mm]
  round 1.8 hole 1.05: 1(-11.25,0) 2(11.25,0)
  silkscreen extent -13,-8.15 13,8.15, body extent -13,-8.15 13,8.15, height 22.9
EEEFK1H220P [mm]
  rect 3.2x1.6 smd: 1(-2.5,0) 2(2.5,0)
  silkscreen extent -4.11,-3.3 3.3,3.3, body extent -3.65,-3.3 3.65,3.3, height 5.8
EEU-FM1C102B [mm]
  rect 1.6x1.6 hole 0.85: 1(0,0)
  round 1.6 hole 0.85: 2(5,0)
  silkscreen extent -2.5,-5 7.5,5, body extent -2.48,-5 7.5,5, height 20
EKZM500ELL471MK20S [mm]
  rect 1.8x1.8 hole 0.92: 1(-2.5,0)
  round 1.8 hole 0.92: 2(2.5,0)
  silkscreen extent -7.49,-6.25 6.25,6.25, body extent -6.25,-6.25 6.25,6.25, height 20.2
EMC2-22RKI [mm]
  round 1.8 hole 1: 1(-7,0) 2(7,0)
  silkscreen extent -4.99,-1.99 5.01,2.01, body extent -7.4,-2.02 7.4,1.98, height 4.49
FOD817DSD [mm]
  rect 1.5x1.3 smd: 1(-4.6,1.27) 2(-4.6,-1.27) 3(4.6,-1.27) 4(4.6,1.27)
  silkscreen extent -5.66,-2.36 3.25,2.36, body extent -5.08,-2.3 5.08,2.3, height 3.85
GSIB-5S [mm]
  rect 2.5x2 hole 1 slot 1.37 at 0 deg: AC1(-2.5,0) AC2(5,0) NEG(12.5,0) POS(-12.5,0)
  silkscreen extent -16.01,-1.55 15,3.05, body extent -15,-1.55 15,3.05, height 26.3
HDR1X2_ [mm] "CONN HEADER VERT 2POS 2.54MM"
  rect 1.5x1.5 hole 0.9: 1(0,0)
  round 1.5 hole 0.9: 2(2.54,0)
  silkscreen extent -1.27,-1.27 3.81,1.27, body extent -1.27,-1.27 3.81,1.27, height 8.44
KF88SM-16.0-3P [mm]
  rect 8x3.5 hole 2.2 slot 5.7 at 0 deg paste-2539.97 mask+0.051: 1(-16,-5.85) 1(-16,5.85)
  oval 8x3.5 hole 2.2 slot 5.7 at 0 deg paste-2539.97 mask+0.051: 2(0,5.85) 2(0,-5.85) 3(16,-5.85) 3(16,5.85)
  round 0 hole 6.6 unplated: S23(-32,0) S23(32,0)
  silkscreen extent -41.7,-10.5 41.7,10.5, body extent -41.7,-10.5 41.7,10.5, height 26.8
"Net Tie Pad" [mil]
  rect 18x25 smd mask-10: 1(-18.5,0) 2(18.5,0)
  Top Layer region: -27.5,-21 15.02,-21 15.02,21 -27.5,21
"PQ50-50 145400-A" [mm]
  rect 3x3 hole 1.45: 1(0,0)
  round 2.05 hole 1.45: 2(0,-7.62) 3(0,-15.24) 4(0,-27.94) 5(0,-35.56) 7(45.72,-43.18) 8(45.72,-35.56) 9(45.72,-27.94) 10(45.72,-15.24) 11(45.72,-7.62) 12(45.72,0)
  round 3 hole 1.45: 6(0,-43.18)
  rect 8x8 hole 6.75: 13(52.72,-35.57) 14(52.72,-26.57) 15(52.72,-16.63) 16(52.72,-7.63)
  silkscreen extent -3,-47.6 59,4.4, body extent -3,-47.6 59,4.4, height 53
R75PR4100AA30K [mm]
  rect 2x2 hole 1.118: 1(-13.754,0)
  round 2 hole 1.118: 2(13.754,0)
  silkscreen extent -16.28,-5.73 16.28,5.73, body extent -16.15,-5.6 16.15,5.6, height 18.06
Res-0603 [mil]
  rect 30x35 smd: 1(-30,0) 2(30,0)
  silkscreen extent -48,-21 48,21, body extent -31,-17 31,17, height 18
RES-0805 [mil] "SMD 0805"
  rect 40x50 smd: 1(-40,0) 2(40,0)
  silkscreen extent -64,-29 64,29, body extent -39,-25 39,24, height 24
Res-1206 [mil]
  rect 60x70 smd: 1(-50,0) 2(50,0)
  silkscreen extent -84,-39 84,39, body extent -63,-31 63,31, height 24
RES-2010 [mm]
  rect 0.9x2.8 smd: 1(-2.35,0) 2(2.35,0)
  silkscreen extent -2.92,-1.52 2.92,1.52, body extent -2.5,-1.25 2.5,1.25, height 0.6
RES-2512 [mm]
  rect 1.6x3.4 smd: 1(-3.25,0) 2(3.25,0)
  silkscreen extent -4.24,-1.85 4.24,1.85, body extent -3.17,-1.63 3.18,1.63, height 0.58
SC70-5 [mm]
  rect 0.85x0.35 smd: 1(-1.1,0.65) 2(-1.1,0) 3(-1.1,-0.65) 4(1.1,-0.65) 5(1.1,0.65)
  silkscreen extent -1.8,-1.07 0.64,1.07, body extent -1.05,-1 1.05,1, height 1.1
"SK 481 50 SA" [mm]
  round 4 hole 2.7: 1(0,0)
  silkscreen extent -26,-22 26,10, body extent -25,-21 25,9, height 45.2
SMA [mm]
  rect 2.5x1.7 smd: 1(-2,0) 2(2,0)
  silkscreen extent -4.45,-1.42 2.06,1.42, body extent -2.6,-1.3 2.6,1.3, height 2.4
SMB_ [mm]
  rect 2.8x2.4 smd: 1(-2.3,0) 2(2.3,0)
  silkscreen extent -2.21,-1.9 4.83,1.91, body extent -2.7,-1.8 2.7,1.8, height 2.3
SMC [mm]
  rect 4.1x4.3 smd: 1(-3.95,0) 2(3.95,0)
  silkscreen extent -7.24,-3.05 3.58,3.05, body extent -3.9,-2.95 3.9,2.95, height 2.41
SOD-123 [mm]
  rect 0.95x0.9 smd: 1(-1.575,0) 2(1.575,0)
  silkscreen extent -1.37,-0.8 2.82,0.8, body extent -1.82,-0.77 1.83,0.78, height 1.5
SOD-123FL [mm]
  rect 1.34x1.8 smd: 1(-1.43,0) 2(1.43,0)
  silkscreen extent -3.25,-1.17 2.26,1.17, body extent -1.8,-0.82 1.8,0.82, height 0.95
SOD-323 [mm]
  rect 0.8x0.9 smd mask+0.055: 1(-1.15,0) 2(1.15,0)
  silkscreen extent -2.01,-0.79 0.94,0.79, body extent -1.3,-0.67 1.3,0.67, height 1.1
SOIC-8 [mm]
  rect 1.55x0.6 smd: 1(-2.7,1.905) 2(-2.7,0.635) 3(-2.7,-0.635) 4(-2.7,-1.905) 5(2.7,-1.905) 6(2.7,-0.635) 7(2.7,0.635) 8(2.7,1.905)
  silkscreen extent -3.76,-2.49 1.99,2.49, body extent -3,-2.45 3,2.45, height 1.7
"SOIC-8(0.154\", 3.90mm Width)" [mm]
  rect 1.55x0.6 smd: 1(-2.7,1.905) 2(-2.7,0.635) 3(-2.7,-0.635) 4(-2.7,-1.905) 5(2.7,-1.905) 6(2.7,-0.635) 7(2.7,0.635) 8(2.7,1.905)
  silkscreen extent -3.79,-2.51 1.8,2.51, body extent -3.01,-2.45 3.01,2.45, height 1.63
SOT-23 [mm] "TRANS NPN 40V 0.6A SOT23"
  rect 0.82x0.92 smd: 1(-0.95,-1) 2(0.95,-1) 3(0,1)
  silkscreen extent -1.68,-1.3 1.55,0.81, body extent -1.5,-1.25 1.5,1.25, height 1.05
Sot-23 [mm] "TRANS NPN 40V 0.6A SOT23"
  rect 0.82x0.92 smd: 1(-0.95,-1) 2(0.95,-1) 3(0,1)
  silkscreen extent -1.68,-1.3 1.55,0.81, body extent -1.5,-1.25 1.5,1.25, height 1.05
SOT-23-5 [mm]
  rect 1.1x0.6 smd: 1(-1.3,0.95) 2(-1.3,0) 3(-1.3,-0.95) 4(1.3,-0.95) 5(1.3,0.95)
  silkscreen extent -2.13,-1.5 0.88,1.5, body extent -1.4,-1.45 1.4,1.45, height 1.45
"SOT- 223" [mm]
  rect 1.5x2 smd: 1(-2.3,-3.05) 2(0,-3.05) 3(2.3,-3.05)
  rect 3.8x2 smd: 4(0,3.05)
  silkscreen extent -3.35,-3.2 3.3,1.8, body extent -3.25,-3.5 3.25,3.5, height 1.61
TO-220-2 [mm]
  rect 2x2.5 hole 1.4 paste-2539.97 mask+0.051: 1(-2.54,0)
  oval 2x2.5 hole 1.4 paste-2539.97 mask+0.051: 2(2.54,0)
  silkscreen extent -5.36,-2.06 5.35,3.13, body extent -5.34,-1.71 5.34,3.1, height 22.95
TO-220-3 [mm]
  rect 2x2 hole 1.2 paste-2539.97 mask+0.051: 1(-2.54,0)
  round 2 hole 1.2 paste-2539.97 mask+0.051: 2(0,0) 3(2.54,0)
  silkscreen extent -5,-2.49 5.03,2.72, body extent -5.05,-1.75 5.05,2.75, height 19.7
TO-252-2L [mm]
  rect 1.5x2.5 smd: 1(-2.3,-3.45) 3(2.3,-3.45)
  rect 7x7 smd: 2(0,3.45)
  silkscreen extent -3.35,-3.53 3.33,-0.2, body extent -3.27,-4.31 3.27,5.63, height 2.34
TSSOP-24 [mm]
  rect 1.65x0.4 smd paste+0 mask+0.051: 1(-3.023,3.575) 2(-3.023,2.925) 3(-3.023,2.275) 4(-3.023,1.625) 5(-3.023,0.975) 6(-3.023,0.325) 7(-3.023,-0.325) 8(-3.023,-0.975) 9(-3.023,-1.625) 10(-3.023,-2.275) 11(-3.023,-2.925) 12(-3.023,-3.575) 13(3.023,-3.575) 14(3.023,-2.925) 15(3.023,-2.275) 16(3.023,-1.625) 17(3.023,-0.975) 18(3.023,-0.325) 19(3.023,0.325) 20(3.023,0.975) 21(3.023,1.625) 22(3.023,2.275) 23(3.023,2.925) 24(3.023,3.575)
  silkscreen extent -4.11,-3.94 2.01,3.89, body extent -3.2,-3.9 3.2,3.9, height 1.2
VSSOP-8-0.65mm [mm]
  rect 1.45x0.45 smd: 1(-2.2,0.975) 2(-2.2,0.325) 3(-2.2,-0.325) 4(-2.2,-0.975) 5(2.2,-0.975) 6(2.2,-0.325) 7(2.2,0.325) 8(2.2,0.975)
  silkscreen extent -3.23,-1.55 1.42,1.55, body extent -2.45,-1.5 2.45,1.5, height 1.1
XSD366-094 [mm]
  round 4 hole 2.4 paste-2539.97 mask+0.102: 1(-12.75,0) 2(12.75,0)
  silkscreen extent -21,-12.5 21,12.5, body extent -21.31,-12.76 21.31,12.76, height 25.3

## Part data
BR1: "BRIDGE RECT 1P 600V 3.5A GSIB-5S", LCSC Part Number=C2838498, Manufacturer="Vishay Semiconductors", ComponentLink1Description=https://datasheet.ciiva.com/4238/gsib25xx-4238464.pdf?src-supplier=Arrow+Electronics, ComponentLink1URL=https://datasheet.ciiva.com/4238/gsib25xx-4238464.pdf?src-supplier=Arrow+Electronics, ComponentLink2Description=https://datasheet.ciiva.com/4238/gsib25xx-4238478.pdf?src-supplier=Arrow+Electronics, ComponentLink2URL=https://datasheet.ciiva.com/4238/gsib25xx-4238478.pdf?src-supplier=Arrow+Electronics, ComponentLink3Description=https://datasheet.ciiva.com/17099/gsib2560-e3-45-17099405.pdf?src-supplier=Allied+Electronics, ComponentLink3URL=https://datasheet.ciiva.com/17099/gsib2560-e3-45-17099405.pdf?src-supplier=Allied+Electronics, ComponentLink4Description=https://datasheet.ciiva.com/15145/getdatasheetpartid-91689-15145262.pdf?src-supplier=Verical, ComponentLink4URL=https://datasheet.ciiva.com/15145/getdatasheetpartid-91689-15145262.pdf?src-supplier=Verical, ComponentLink5Description=https://datasheet.ciiva.com/26323/gsib25xx-26323910.pdf?src-supplier=Element14, ComponentLink5URL=https://datasheet.ciiva.com/26323/gsib25xx-26323910.pdf?src-supplier=Element14, ComponentLink6Description=https://datasheet.ciiva.com/1175/gsib25xx-1175169.pdf?src-supplier=Element14, ComponentLink6URL=https://datasheet.ciiva.com/1175/gsib25xx-1175169.pdf?src-supplier=Element14, ComponentLink7Description=https://datasheet.ciiva.com/11196/gsib25xx-11196312.pdf?src-supplier=Avnet, ComponentLink7URL=https://datasheet.ciiva.com/11196/gsib25xx-11196312.pdf?src-supplier=Avnet, ComponentLink8Description=https://datasheet.ciiva.com/885/gsib25xx-885637.pdf?src-supplier=Digikey, ComponentLink8URL=https://datasheet.ciiva.com/885/gsib25xx-885637.pdf?src-supplier=Digikey, ComponentLink9Description=https://datasheet.ciiva.com/16387/gsib20xx-16387863.pdf?src-supplier=Future+Electronics, ComponentLink9URL=https://datasheet.ciiva.com/16387/gsib20xx-16387863.pdf?src-supplier=Future+Electronics, Item Type="Bridge Rectifier", Manufacturer Part Number=GSIB2560-E3/45, Pricing="1=2.95, 10=2.01, 50=2.01, 100=1.62, 1000=1.5, 10000=1.49 (USD)", RoHS=Yes, Stock=2131, Supplier=Mouser
C1 C2 C9 C10: library part C771U472MYWDBA7317, "CAP CER 4.7NF X1/Y2 400V/250V", Manufacturer=KEMET, Supplier Part Number=80-C771U472MYWDB7317, Item Type=Capacitors, Manufacturer Part Number=C771U472MYWDBA7317, Pricing="1=0.96, 10=0.607, 50=0.607, 100=0.495, 1000=0.342, 10000=0.307 (USD)", RoHS=Yes, RoHS Compliant=Yes, Stock=2909, Supplier=Mouser
C3 C4 C5 C6: library part 381LR331M450K052, "CAP ALUM 330UF 20% 450V SNAP TH", Manufacturer="Cornell Dubilier", ComponentLink1Description=https://datasheet.ciiva.com/101/381lr-101261.pdf?src-supplier=Digikey, ComponentLink1URL=https://datasheet.ciiva.com/101/381lr-101261.pdf?src-supplier=Digikey, ComponentLink2Description=https://datasheet.ciiva.com/5373/381lr-5373947.pdf?src-supplier=Mouser, ComponentLink2URL=https://datasheet.ciiva.com/5373/381lr-5373947.pdf?src-supplier=Mouser, Item Type="Aluminum Electrolytic Capacitors", Manufacturer Part Number=381LR331M450K052, Pricing="1=8.38, 10=5.898, 50=4.8932, 100=4.6875 (USD)", RoHS=Yes, Stock=7391, Supplier=Digikey
C7 C8: library part B32933A3474M000, "CAP FILM 0.47UF 20% 305VAC RAD", Case/Package=Radial, Dielectric Material=Polyester, Manufacturer="TDK EPCOS", Ratings=AEC-Q200,X2, Supplier Part Number=495-75595-ND, ComponentLink1Description=https://en.tdk.eu/inf/20/20/ds/MKT_B32932_936.pdf?src-supplier=Digikey, ComponentLink1URL=https://en.tdk.eu/inf/20/20/ds/MKT_B32932_936.pdf?src-supplier=Digikey, Item Type=Capacitors, Manufacturer Part Number=B32933A3474M000, Pricing="1=1.25, 10=0.938, 50=0.8558, 100=0.701, 510=0.55953, 1020=0.4937, 2550=0.46078, 5100=0.45713 (USD)", RoHS=Yes, RoHS Compliant=Yes, Series=B32933, Stock=1785, Supplier=Digikey, Termination="PC Pins"
C11: library part R75PR4100AA30K, "Cap Film 0.47uF 305VAC PET 20% (26.5 X 8.5 X 16.5mm) Radial 22.5mm 105°C Bulk", Case/Package=Radial, Dielectric Material=Polyester, Manufacturer=KEMET, Ratings=AEC-Q200,X2, Supplier Part Number=80-R75PR4100AA30K, Category="Film Capacitors", ComponentLink1Description=https://datasheet.ciiva.com/13404/kem-f3106-r75-364632-13404539.pdf?src-supplier=Mouser, ComponentLink1URL=https://datasheet.ciiva.com/13404/kem-f3106-r75-364632-13404539.pdf?src-supplier=Mouser, ComponentLink2Description=https://en.tdk.eu/inf/20/20/ds/MKT_B32932_936.pdf?src-supplier=Digikey, ComponentLink2URL=https://en.tdk.eu/inf/20/20/ds/MKT_B32932_936.pdf?src-supplier=Digikey, Item Type=Capacitors, Manufacturer Part Number=R75PR4100AA30K, Pricing="1=1.83, 10=1.31, 50=1.03, 100=0.854, 1000=0.846, 10000=0.846 (USD)", RoHS=Yes, RoHS Compliant=Yes, Series=B32933, Stock=3429, Supplier=Mouser, Termination="PC Pins"
C12 C22 C34 C48 C49 C68 C69 C81 C83 C89 C92 C98 C99 C100 C105 C106: library part C1608X7R1E105K080AB, "CAP CER 1UF 25V X7R 0603", Case Code (Imperial)=0603, Case Code (Metric)=1608, Dielectric=X7R, Dielectric Material=4241ConductorMaterial, Manufacturer=TDK, Max Operating Temperature=125°C, Min Operating Temperature=-55°C, Package Quantity=1, Tolerance=10%, Voltage=25V, Case/Package=0603, ComponentLink1Description=https://datasheet.ciiva.com/23802/1796654-23802776.pdf?src-supplier=Newark, ComponentLink1URL=https://datasheet.ciiva.com/23802/1796654-23802776.pdf?src-supplier=Newark, ComponentLink2Description=https://datasheet.ciiva.com/22725/1913358-22725530.pdf?src-supplier=Element14, ComponentLink2URL=https://datasheet.ciiva.com/22725/1913358-22725530.pdf?src-supplier=Element14, ComponentLink3Description=https://datasheet.ciiva.com/28693/mlcc-commercial-general-en-28693447.pdf?src-supplier=Element14, ComponentLink3URL=https://datasheet.ciiva.com/28693/mlcc-commercial-general-en-28693447.pdf?src-supplier=Element14, ComponentLink4Description=https://datasheet.ciiva.com/6290/tdkmlcccaprange-6290854.pdf?src-supplier=Digikey, ComponentLink4URL=https://datasheet.ciiva.com/6290/tdkmlcccaprange-6290854.pdf?src-supplier=Digikey, ComponentLink5Description=https://datasheet.ciiva.com/26834/getdatasheetpartid-727834-26834380.pdf?src-supplier=Verical, ComponentLink5URL=https://datasheet.ciiva.com/26834/getdatasheetpartid-727834-26834380.pdf?src-supplier=Verical, Construction=Flat, Depth=0.8mm, Height=0.8mm, Item Type=Capacitors, Lead Free="Lead Free", Length=1.6mm, Manufacturer Part Number=C1608X7R1E105K080AB, Material=4241ConductorMaterial, Mounting Technology="Surface Mount", Packaging="Tape and Reel", Pricing="1=0.18, 10=0.103, 50=0.0722, 100=0.0627, 500=0.04664, 1000=0.04163 (USD)", Radiation Hardening=No, Reach SVHC Compliant=No, RoHS=Yes, RoHS Compliant=Yes, Series=C, Stock=239206, Supplier=Digikey, Thickness=0.037inch, Voltage Rating=25V, Width=0.031inch
C13 C21 C30 C35 C40 C41 C46 C47 C50 C51 C56 C57 C67 C70 C80 C82 C85 C90: library part CL10B104KB8WPNC, "CAP CER 0.1UF 50V X7R 0603", Case Code (Imperial)=0603, Case Code (Metric)=1608, LCSC Part Number=C307348, Max Operating Temperature=125°C, Min Operating Temperature=-55°C, Ratings=AEC-Q200, Supplier Part Number=2575919, Tolerance=10%, Voltage Rating=50V, Case/Package=0603, Category="Ceramic Capacitors", ComponentLink1Description=LCSC, ComponentLink2Description=http://www.farnell.com/datasheets/2710560.pdf?src-supplier=Farnell, ComponentLink2URL=http://www.farnell.com/datasheets/2710560.pdf?src-supplier=Farnell, ComponentLink3Description=http://www.samsungsem.com/kr/support/product-search/mlcc/CL10B104KB8WPNC.jsp?src-supplier=Digi-Key, ComponentLink3URL=http://www.samsungsem.com/kr/support/product-search/mlcc/CL10B104KB8WPNC.jsp?src-supplier=Digi-Key, ComponentLink4Description=http://www.farnell.com/datasheets/2710560.pdf?src-supplier=Element14, ComponentLink4URL=http://www.farnell.com/datasheets/2710560.pdf?src-supplier=Element14, ComponentLink5Description=https://datasheet.octopart.com/CL10B104KB8WPNC-Samsung-Electro-Mechanics-datasheet-120093645.pdf?src-supplier=Future+Electronics, ComponentLink5URL=https://datasheet.octopart.com/CL10B104KB8WPNC-Samsung-Electro-Mechanics-datasheet-120093645.pdf?src-supplier=Future+Electronics, ComponentLink6Description=http://www.farnell.com/datasheets/2710560.pdf?src-supplier=Newark, ComponentLink6URL=http://www.farnell.com/datasheets/2710560.pdf?src-supplier=Newark, ComponentLink7Description=http://www.samsungsem.com/servlet/FileDownload?type=spec&file=CL10B104KB8WPNC.pdf&src-supplier=Avnet, ComponentLink7URL=http://www.samsungsem.com/servlet/FileDownload?type=spec&file=CL10B104KB8WPNC.pdf&src-supplier=Avnet, ComponentLink8Description=https://datasheet.octopart.com/CL10B104KB8WPNC-Samsung-datasheet-8326407.pdf?src-supplier=TME, ComponentLink8URL=https://datasheet.octopart.com/CL10B104KB8WPNC-Samsung-datasheet-8326407.pdf?src-supplier=TME, Height=900um, Item Type=Capacitor, Lead Free=5697LeadFree, Material=4241ConductorMaterial, Mounting Technology="Surface Mount", Packaging="Cut Tape", Pricing="100=0.021, 500=0.019, 1000=0.015, 2000=0.01 (GBP)", RoHS=Yes, RoHS Compliant=Yes, Series=CL, Stock=400, Supplier=Rs, Voltage Rating (DC)=50V
C14: library part C1608X5R1E475KT000E, "CAP CER, 4.7 µF, 25 V, 0603", Case Code (Imperial)=0603, Case Code (Metric)=1608, Dielectric=X5R, Dielectric Material=Ceramic, LCSC Part Number=C76615, Manufacturer=TDK, Max Operating Temperature=85°C, Min Operating Temperature=-55°C, Package Quantity=4000, Supplier Part Number 1=2220Y1000562GCT-ND, Tolerance=10%, Voltage Rating=25V, Capacitance=4.7uF, Case/Package=0603, Category="Ceramic Capacitors", ComponentLink1Description=https://datasheet.ciiva.com/48587/6print-detail-pdf-phplangenpart-noc1608x5r1e475k080acimp-unit-xmhz-48587141.pdf?src-supplier=Onlinecomponents.com, ComponentLink1URL=https://datasheet.ciiva.com/48587/6print-detail-pdf-phplangenpart-noc1608x5r1e475k080acimp-unit-xmhz-48587141.pdf?src-supplier=Onlinecomponents.com, ComponentLink2Description=https://datasheet.ciiva.com/24216/mlcc-commercial-general-en-24216326.pdf?src-supplier=Mouser, ComponentLink2URL=https://datasheet.ciiva.com/24216/mlcc-commercial-general-en-24216326.pdf?src-supplier=Mouser, ComponentLink3Description=https://datasheet.ciiva.com/48671/mlcc-commercial-general-en-48671304.pdf?src-supplier=Avnet, ComponentLink3URL=https://datasheet.ciiva.com/48671/mlcc-commercial-general-en-48671304.pdf?src-supplier=Avnet, Depth=0.8mm, Height=0.8mm, Item Type=Capacitor, Lead Free="Lead Free", Length=1.6mm, Manufacturer Part Number=C1608X5R1E475KT000E, Mount="Surface Mount", Packaging="Tape and Reel", Pricing 2="100=0.23400, 200=0.21900, 1000=0.20700, 2000=0.18700 (GBP)", REACH SVHC="No SVHC", Resistor Type=Ceramic, RoHS=No, Stock 2=16120, Supplier 1=Digi-Key, Supplier 2=RSComponents, Supplier Part Number 2=9159158P, Termination=SMD/SMT, Thickness=0.039inch, Voltage Rating (DC)=25V, Weight=7.1E-05oz, Width=0.031inch
C15 C24: library part C1608C0G1H272J080AA, "CAP CER 2700PF 50V C0G 0603", Case Code (Imperial)=0603, Case Code (Metric)=1608, Dielectric=C0G, Dielectric Material=Ceramic, Manufacturer=TDK, Max Operating Temperature=125°C, Min Operating Temperature=-55°C, Package Quantity=4000, Supplier Part Number=445-2669-1-ND, Tolerance=5%, Voltage Rating=50V, Case/Package=0603, ComponentLink1Description=https://datasheet.ciiva.com/24221/c1608c0g1h272j080aa-264507-24221179.pdf?src-supplier=Mouser, ComponentLink1URL=https://datasheet.ciiva.com/24221/c1608c0g1h272j080aa-264507-24221179.pdf?src-supplier=Mouser, ComponentLink2Description=https://datasheet.ciiva.com/6291/tdkmlcccaprange-6291545.pdf?src-supplier=Digikey, ComponentLink2URL=https://datasheet.ciiva.com/6291/tdkmlcccaprange-6291545.pdf?src-supplier=Digikey, ComponentLink3Description=https://datasheet.ciiva.com/6291/tdkmlcccaprange-6291541.pdf?src-supplier=Digikey, ComponentLink3URL=https://datasheet.ciiva.com/6291/tdkmlcccaprange-6291541.pdf?src-supplier=Digikey, ComponentLink4Description=https://datasheet.ciiva.com/6291/tdkmlcccaprange-6291550.pdf?src-supplier=Digikey, ComponentLink4URL=https://datasheet.ciiva.com/6291/tdkmlcccaprange-6291550.pdf?src-supplier=Digikey, ComponentLink5Description=https://datasheet.ciiva.com/28576/1744655-28576939.pdf?src-supplier=Element14, ComponentLink5URL=https://datasheet.ciiva.com/28576/1744655-28576939.pdf?src-supplier=Element14, Construction=Flat, Depth=0.8mm, Height=0.8mm, Item Type=Capacitors, Lead Free="Lead Free", Length=1.6mm, Manufacturer Part Number=C1608C0G1H272J080AA, Mounting Technology="Surface Mount", Packaging="Tape and Reel", Pricing="1=0.16, 10=0.091, 50=0.0638, 100=0.0554, 500=0.04098, 1000=0.03649 (USD)", Reach SVHC Compliant=No, RoHS=Yes, RoHS Compliant=Yes, Series=C, Stock=2978, Supplier=Digikey, Termination=SMD/SMT, Voltage Rating (DC)=50V, Weight=7.1E-05oz, Width=0.8mm
C16 C17: library part C2012X7R2E102K085AA, "CAP CER 1000PF 250V X7R 0805", LCSC Part Number=C2182167, Manufacturer=TDK, ComponentLink1Description=https://datasheet.ciiva.com/24218/c2012x7r2e102k085aa-264958-24218883.pdf?src-supplier=Mouser, ComponentLink1URL=https://datasheet.ciiva.com/24218/c2012x7r2e102k085aa-264958-24218883.pdf?src-supplier=Mouser, ComponentLink2Description=https://datasheet.ciiva.com/11788/0900766b80fc5cba-11788133.pdf?src-supplier=Rs, ComponentLink2URL=https://datasheet.ciiva.com/11788/0900766b80fc5cba-11788133.pdf?src-supplier=Rs, ComponentLink3Description=https://datasheet.ciiva.com/22684/1484596-22684118.pdf?src-supplier=Element14, ComponentLink3URL=https://datasheet.ciiva.com/22684/1484596-22684118.pdf?src-supplier=Element14, ComponentLink4Description=https://datasheet.ciiva.com/28602/1484596-28602278.pdf?src-supplier=Element14, ComponentLink4URL=https://datasheet.ciiva.com/28602/1484596-28602278.pdf?src-supplier=Element14, ComponentLink5Description=https://datasheet.ciiva.com/16390/e413-c-16390590.pdf?src-supplier=Future+Electronics, ComponentLink5URL=https://datasheet.ciiva.com/16390/e413-c-16390590.pdf?src-supplier=Future+Electronics, Item Type=Capacitor, Manufacturer Part Number=C2012X7R2E102K085AA, Material=4241ConductorMaterial, Pricing="1=0.16, 10=0.091, 50=0.0638, 100=0.0554, 500=0.04098, 1000=0.03649 (USD)", RoHS=Yes, Stock=74527, Supplier=Digikey
C18: library part EEU-FM1C102B, "CAP ALUM 1000UF 20% 16V RADIAL", Case/Package=Radial, ESR (Equivalent Series Resistance)=19mR, LCSC Part Number=C1588681, Manufacturer=Panasonic, Max Operating Temperature=105°C, Min Operating Temperature=-40°C, Package Quantity=500, Ripple Current=2.18A, Tolerance=20%, Voltage Rating=16V, ComponentLink1Description=https://datasheet.ciiva.com/24025/a-e-461514-24025941.pdf?src-supplier=Mouser, ComponentLink1URL=https://datasheet.ciiva.com/24025/a-e-461514-24025941.pdf?src-supplier=Mouser, ComponentLink2Description=https://datasheet.ciiva.com/11677/aba0000ce108-11677710.pdf?src-supplier=Avnet, ComponentLink2URL=https://datasheet.ciiva.com/11677/aba0000ce108-11677710.pdf?src-supplier=Avnet, Diameter=10mm, Height=20mm, Height - Seated (Max)=0.866inch, Impedance=19mR, Item Type=Capacitors, Lead Diameter=0.6mm, Lead Free="Lead Free", Lead Pitch=5mm, Length=20mm, Life (Hours)=5000Hour, Manufacturer Part Number=EEU-FM1C102B, Mounting Technology="Through Hole", Packaging="Ammo Pack", Pricing="1=0.79, 10=0.466, 50=0.466, 100=0.372, 1000=0.26, 10000=0.219 (USD)", Radiation Hardening=No, RoHS=Yes, RoHS Compliant=Yes, Series=FM, Stock=1140, Supplier=Mouser, Termination=Radial, Voltage Rating (DC)=16V